# Altium PCB PCB1.PcbDoc
Units mm, origin at the board's own origin, x right, y up, seen from the top; angles counter-clockwise.
Board outline 210 x 7 mm, 2 copper layers (Top Layer, Bottom Layer); 29 components, 28 nets, 59 pads, 0 vias.
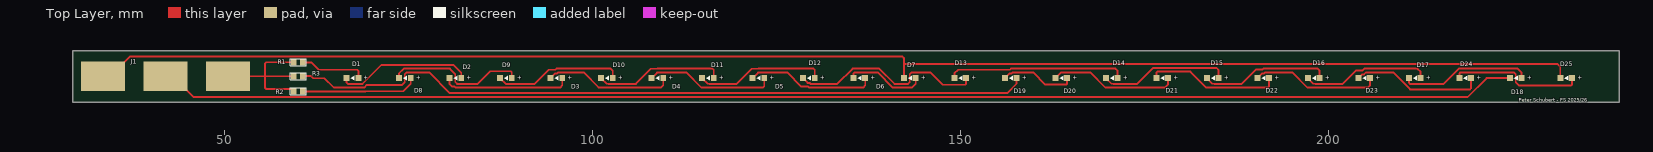
[diagram p0: Top Layer view]
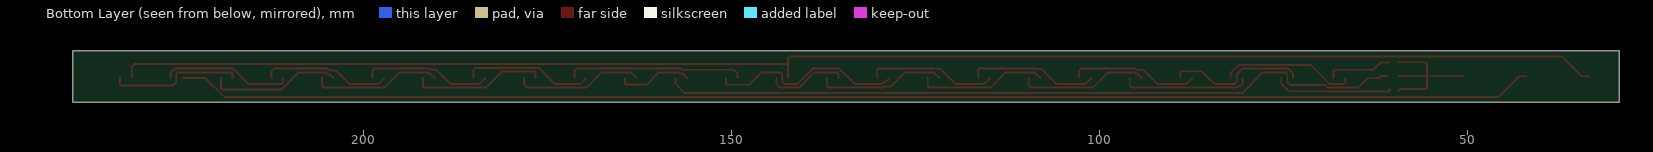
[diagram p1: Bottom Layer view, seen from below]
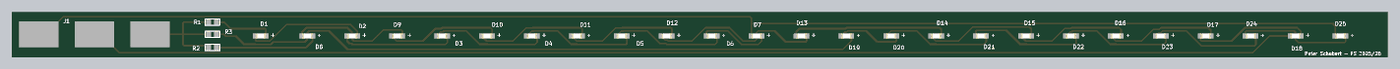
[diagram p2: 3D render of the assembled board from above, using the file's embedded part models]

## Layer stack, top to bottom
Top Solder: solder mask 0.0102, Solder Resist, Dk 3.5
Top Layer: signal copper 0.0356
Dielectric 1: dielectric 0.32, FR-4, Dk 4.8
Bottom Layer: signal copper 0.0356
Bottom Solder: solder mask 0.0102, Solder Resist, Dk 3.5

## Board outline
29.464,67.31 239.464,67.31 239.464,74.31 29.464,74.31

## Design rules (kind name [scope] priority, off if disabled: settings)
AcuteAngle [All] p1: minimum=6.00000000000000E+0001 checktracksonly=FALSE
BoardOutlineClearance "BoardOutlineClearance Overlay" [OnLayer('Top Overlay') or OnLayer('Bottom Overlay')] p1: gap=-2 ignorepadtopadclearanceinfootprint=FALSE
BoardOutlineClearance "BoardOutlineClearance general" [All] p2: gap=0.25 ignorepadtopadclearanceinfootprint=FALSE
Clearance "Clearance TS-LV without coating" [InNetClass('TS') vs InNetClass('LV')] p1 off: gap=20 ignorepadtopadclearanceinfootprint=TRUE except(0: Arc-Text Track-Text SMDPad-Text THPad-Text Via-Text Fill-Text Poly-Text Region-Text Text-Text Text-Hole) // without Conformal Coating (Rules 2023.1.0: EV 4.3.6)
Clearance [All] p2: gap=0.254 ignorepadtopadclearanceinfootprint=FALSE
Clearance "Clearance TS-LV" [InNetClass('TS') vs InNetClass('LV')] p3: gap=4.15 ignorepadtopadclearanceinfootprint=TRUE except(0: Arc-Text Track-Text SMDPad-Text THPad-Text Via-Text Fill-Text Poly-Text Region-Text Text-Text)
Clearance "Clearance TS-TS" [InNetClass('TS+') vs InNetClass('TS-')] p4: gap=3.15 ignorepadtopadclearanceinfootprint=TRUE except(0: Arc-Text Track-Text SMDPad-Text THPad-Text Via-Text Fill-Text Poly-Text Region-Text Text-Text)
Clearance "Clearance general" [All] p5: gap=0.15 ignorepadtopadclearanceinfootprint=TRUE except(0: Arc-Text Track-Text SMDPad-Text THPad-Text Via-Text Text-Text)
ComponentClearance [All] p1: gap=0.1 collisioncheckmode=3 verticalgap=1 showdistances=FALSE donotcheckwithout3dbody=TRUE
Creepage [InNetClass('TS') vs InNetClass('LV')] p1: checkdistance=5 applytopolygonpour=TRUE // Kriechstrecke
DiffPairsRouting [All] p1: maxlimit=0.5 minlimit=0.15 mostfreqgap=0.2 toplayer_minwidth=0.15 toplayer_maxwidth=0.5 toplayer_prefwidth=0.2 bottomlayer_minwidth=0.15 bottomlayer_maxwidth=0.5 bottomlayer_prefwidth=0.2 maxuncoupledlength=12.7
Height [All] p1: minheight=0 maxheight=100 prefheight=15
HoleSize [All] p1: absolutevalues=TRUE maxlimit=5 minlimit=0.25 maxpercent=80.000 minpercent=20.000
HoleToHoleClearance [All] p1: gap=0.5 allowstackedmicrovias=FALSE
MinimumAnnularRing [All] p1: minimumring=0.175
MinimumSolderMaskSliver [All] p1: minsoldermaskwidth=0.15
PasteMaskExpansion "PasteMaskExpansion THT" [OnMultiLayer] p1: expansion=-2539.975 usepaste=FALSE // THT-parts without paste
PasteMaskExpansion [All] p2: expansion=0 percent=10.000000
PlaneClearance [All] p1: clearance=0.5
PlaneConnect [All] p1: planeconnectstyle=Relief reliefexpansion=0.5 reliefentries=4 reliefconductorwidth=0.25 reliefairgap=0.15
PolygonConnect [All] p1: connectstyle=Relief reliefconductorwidth=0.254 reliefentries=4 polygonreliefangle="90 Angle" airgapwidth=0.254
PolygonConnect "PolygonConnect Stitching Via" [IsStitchingVia] p2: connectstyle=Direct reliefconductorwidth=0.254 reliefentries=4 polygonreliefangle="90 Angle" airgapwidth=0.254
PolygonConnect "PolygonConnect general" [All] p3: thpad.connectstyle=Relief thpad.reliefconductorwidth=0.25 thpad.reliefentries=4 thpad.polygonreliefangle="45 Angle" thpad.airgapwidth=0.2 smdpad.connectstyle=Relief smdpad.reliefconductorwidth=0.25 smdpad.reliefentries=4 smdpad.polygonreliefangle="90 Angle" smdpad.airgapwidth=0.2 via.connectstyle=Relief via.reliefconductorwidth=0.25 via.reliefentries=4 via.polygonreliefangle="45 Angle" via.airgapwidth=0.2
RoutingCorners [All] p1: cornerstyle=45-Degree minsetback=2.5 maxsetback=2.5
RoutingTopology "RoutingTopology Top" [OnLayer('Top Layer')] p2: topology=Vertical // Helplines top-layer
RoutingTopology "RoutingTopology Bottom" [OnLayer('Bottom Layer')] p3: topology=Horizontal // Helplines bottom-layer
RoutingVias [All] p1: holewidth=0.711 width=1.27 viastyle="Through Hole" minholewidth=0.711 minwidth=1.27 maxholewidth=0.711 maxwidth=1.27
RoutingVias "RoutingVias StitchingVias" [IsStitchingVia] p2: holewidth=0.3 width=0.65 viastyle="Through Hole" minholewidth=0.25 minwidth=0.6 maxholewidth=0.3 maxwidth=0.65
RoutingVias "RoutingVias general" [All] p3: holewidth=0.3 width=0.65 viastyle="Through Hole" minholewidth=0.25 minwidth=0.6 maxholewidth=0.6 maxwidth=0.85
SMDToCorner [All] p1: distance=39370
SilkToSilkClearance [All] p1: silktosilkclearance=0
SilkToSolderMaskClearance [IsPad] p1: minsilkscreentomaskgap=0.1 clearancetoexposedcopper=FALSE
SolderMaskExpansion [All] p1: expansion=0 istentingtop=FALSE
SolderMaskExpansion "SolderMaskExpansion Vias" [IsVia] p2: expansion=0.1 istentingtop=TRUE // vias tented
SolderMaskExpansion "SolderMaskExpansion general" [All] p3: expansion=0.1 istentingtop=FALSE
SupplyNets "Schematic Supply Nets_2" [InNet('HV+')] p1: voltage=0.000
SupplyNets "Schematic Supply Nets_1" [InNet('LED-')] p2: voltage=0.000
UnRoutedNet [All] p1: checkbadconnections=TRUE
Width [All] p1: maxlimit=0.254 minlimit=0.254 preferedwidth=0.254
Width "Width Powerlane" [InNetClass('Power')] p2: maxlimit=5 minlimit=0.15 preferedwidth=0.5
Width "Width general" [All] p3: maxlimit=3 minlimit=0.15 preferedwidth=0.2
17 further rules are at their usual default settings.

## Components (designator, comment, footprint, x,y, rotation, side; value= is the part's Value field where it differs from the comment)
D1 "Blue, 3.2V" LED_WL-SMCW_0603_H=0.7mm 67.437,70.612 r0 top
D2 "Blue, 3.2V" LED_WL-SMCW_0603_H=0.7mm 81.407,70.612 r0 top
D3 "Blue, 3.2V" LED_WL-SMCW_0603_H=0.7mm 95.123,70.612 r0 top
D4 "Blue, 3.2V" LED_WL-SMCW_0603_H=0.7mm 108.839,70.612 r0 top
D5 "Blue, 3.2V" LED_WL-SMCW_0603_H=0.7mm 122.555,70.612 r0 top
D6 "Blue, 3.2V" LED_WL-SMCW_0603_H=0.7mm 136.271,70.612 r0 top
D7 "Blue, 3.2V" LED_WL-SMCW_0603_H=0.7mm 143.129,70.612 r0 top
D8 "Yellow, 2V" LED_WL-SMCW_0603_H=0.7mm 74.549,70.612 r0 top
D9 "Yellow, 2V" LED_WL-SMCW_0603_H=0.7mm 88.265,70.612 r0 top
D10 "Yellow, 2V" LED_WL-SMCW_0603_H=0.7mm 101.981,70.612 r0 top
D11 "Yellow, 2V" LED_WL-SMCW_0603_H=0.7mm 115.697,70.612 r0 top
D12 "Yellow, 2V" LED_WL-SMCW_0603_H=0.7mm 129.413,70.612 r0 top
D13 "Yellow, 2V" LED_WL-SMCW_0603_H=0.7mm 149.987,70.612 r0 top
D14 "Yellow, 2V" LED_WL-SMCW_0603_H=0.7mm 170.561,70.612 r0 top
D15 "Yellow, 2V" LED_WL-SMCW_0603_H=0.7mm 184.277,70.612 r0 top
D16 "Yellow, 2V" LED_WL-SMCW_0603_H=0.7mm 197.993,70.612 r0 top
D17 "Yellow, 2V" LED_WL-SMCW_0603_H=0.7mm 211.709,70.612 r0 top
D18 "Yellow, 2V" LED_WL-SMCW_0603_H=0.7mm 225.425,70.612 r0 top
D19 "Blue, 3.2V" LED_WL-SMCW_0603_H=0.7mm 156.845,70.612 r0 top
D20 "Blue, 3.2V" LED_WL-SMCW_0603_H=0.7mm 163.703,70.612 r0 top
D21 "Blue, 3.2V" LED_WL-SMCW_0603_H=0.7mm 177.419,70.612 r0 top
D22 "Blue, 3.2V" LED_WL-SMCW_0603_H=0.7mm 191.135,70.612 r0 top
D23 "Blue, 3.2V" LED_WL-SMCW_0603_H=0.7mm 204.851,70.612 r0 top
D24 "Blue, 3.2V" LED_WL-SMCW_0603_H=0.7mm 218.567,70.612 r0 top
D25 "Blue, 3.2V" LED_WL-SMCW_0603_H=0.7mm 232.283,70.612 r0 top
J1 "Pad-Connenctor" "TSAL-L Connector" 42.037,70.866 r90 top
R1 "Resistor" 0603(1608)_L 60.071,72.771 r0 top value=*80R
R2 "Resistor" 0603(1608)_L 60.071,68.834 r0 top value=*100R
R3 "Resistor" 0603(1608)_L 60.071,70.866 r0 top value=*80R

## Footprints (in the part's own frame and the unit in brackets; to place one, negate y for a bottom-side part, rotate by r counter-clockwise, add the part's x,y. Pads: shape width x height; smd on the part's side, far side on the other; paste and mask are expansions set on the pad)
0603(1608)_L [mm] "Chip Resistor, 2-Leads, Body 1.60x0.85mm, IPC High Density"
  rect 0.75x0.85 smd: 1(-0.625,0) 2(0.625,0)
  silkscreen extent -1.1,-0.5 1.1,0.5, body extent -0.85,-0.48 0.85,0.48, height 0.55
LED_WL-SMCW_0603_H=0.7mm [mm] "SMD Mono-color Chip LED, body 1.6x0.8mm"
  rect 0.8x0.8 smd: 1(-0.8,0) 2(0.8,0)
  silkscreen extent -0.23,-0.3 0.25,0.3, body extent -0.8,-0.4 0.8,0.4, height 0.7
"TSAL-L Connector" [mm]
  rect 4x6 smd paste+0 mask+0: 1(0,8.5) 2(0,0) 3(0,-8.5)

## Part data
D1 D2 D3 D4 D5 D6 D7 D19 D20 D21 D22 D23 D24 D25: library part LED-WL-SMCW-150060BS75000, "WL-SMCW SMT Mono-color Chip LED Waterclear, size 0603, Blue, 3.2V, 140deg", Emitting Color=Blue, Forward Voltage typ.=3.2V, Manufacturer="Wurth Elektronik", Operating Temperature="-40 to +85degC", PartNumber=150060BS75000, Chip Technology=InGaN, ComponentLink1Description=Manufacturer, ComponentLink1URL=http://www.we-online.de, ComponentLink2Description=Datasheet, ComponentLink2URL=https://www.we-online.com/catalog/datasheet/150060BS75000.pdf, Dominant Wavelength typ.=470nm, Luminous Intensity typ.=145mcd, Mounting Technology=SMT, Packaging="Tape and Reel", Peak Wavelength typ.=465nm, Published Date="December 2019", Size=0603, Viewing Angle=140deg
D8 D9 D10 D11 D12 D13 D14 D15 D16 D17 D18: library part LED-WL-SMCW-150060YS75000, "WL-SMCW SMT Mono-color Chip LED Waterclear, size 0603, Yellow, 2V, 140deg", Emitting Color=Yellow, Forward Voltage typ.=2V, Manufacturer="Wurth Elektronik", Operating Temperature="-40 to +85degC", Part Number=150060YS75000, Chip Technology=AlInGaP, ComponentLink1Description=Manufacturer, ComponentLink1URL=http://www.we-online.de, ComponentLink2Description=Datasheet, ComponentLink2URL=https://www.we-online.com/catalog/datasheet/150060YS75000.pdf, Dominant Wavelength typ.=590nm, Luminous Intensity typ.=120mcd, Mounting Technology=SMT, Packaging="Tape and Reel", Peak Wavelength typ.=595nm, Published Date="December 2019", Size=0603, Viewing Angle=140deg
J1: library part Pad-Connector
R1 R3: library part RES-Std, "General resistor", Resistance=*80R, Tolerance=*%
R2: library part RES-Std, "General resistor", Resistance=*100R, Tolerance=*%

## Nets (pads, with @x,y where several pads share a name; then routed paths per layer and width w, separated by ;. In a path a pad name is that pad's centre, name@x,y a point inside that pad or via, vN(x,y) a via of type N, cw(c..) or ccw(c..) an arc to the next point about the centre after c; other vN are vias at no path point)
+24V: J1.3 R1.1 R2.1 R3.1 | length 20.3
  Top Layer w0.254: J1.3 55.562,70.866 ; R2.1 59.446,68.884 59.198,69.132 55.711,69.132 55.562,69.281 55.562,70.866 ; R3.1 55.562,70.866 ; R1.1 55.711,72.771 55.562,72.622 55.562,70.866
GND_BLUE: D7.1 D25.1 J1.1 | length 203.6
  Top Layer w0.254: J1.1 34.537,70.866 37.248,73.577 142.1,73.577 142.329,73.348 142.329,72.517 ; D7.1 142.329,72.517 ; D25.1 231.483,72.174 231.14,72.517 142.329,72.517
GND_YELLOW: D18.1 J1.2 | length 184.8
  Top Layer w0.254: J1.2 43.037,70.866 45.875,68.028 218.877,68.028 221.461,70.612 D18.1
NetD1_1: D1.1 D2.2 | length 18.5
  Top Layer w0.254: D1.1 66.637,69.98 66.786,69.831 68.795,69.831 71.373,72.409 81.134,72.409 82.207,71.336 D2.2
NetD1_2: D1.2 R1.2 | length 9
  Top Layer w0.254: R1.2 60.746,72.721 61.899,72.721 62.865,71.755 68.088,71.755 68.237,71.606 D1.2
NetD2_1: D2.1 D3.2 | length 17.4
  Top Layer w0.254: D2.1 80.607,69.858 80.996,69.469 81.293,69.469 81.439,69.323 95.628,69.323 95.923,69.618 D3.2
NetD3_1: D3.1 D4.2 | length 17.6
  Top Layer w0.254: D3.1 94.958,71.247 95.219,71.247 95.365,71.393 98.814,71.393 100.865,69.342 101.994,69.342 102.013,69.323 109.328,69.323 109.639,69.634 D4.2
NetD4_1: D4.1 D5.2 | length 17.7
  Top Layer w0.254: D4.1 108.801,71.374 109.062,71.374 109.081,71.393 112.765,71.393 114.816,69.342 115.71,69.342 115.729,69.323 123.187,69.323 123.355,69.491 D5.2
NetD5_1: D5.1 D6.2 | length 17.6
  Top Layer w0.254: D5.1 122.517,71.374 122.778,71.374 122.797,71.393 126.481,71.393 128.405,69.469 129.299,69.469 129.445,69.323 136.776,69.323 137.071,69.618 D6.2
NetD6_1: D6.1 D7.2 | length 11
  Top Layer w0.254: D6.1 135.471,71.244 135.62,71.393 138.77,71.393 140.84,69.323 143.394,69.323 143.929,69.858 D7.2
NetD8_1: D8.1 D9.2 | length 19.3
  Top Layer w0.254: D8.1 73.749,71.246 74.404,71.901 80.657,71.901 81.388,71.17 81.388,70.092 81.649,69.831 84.427,69.831 86.138,71.542 88.916,71.542 89.065,71.393 D9.2
NetD8_2: D8.2 R2.2 | length 16.2
  Top Layer w0.254: R2.2@60.579,69.088 R2.2@60.833,68.834 ; R2.2@60.696,68.815 69.216,68.815 69.235,68.834 74.352,68.834 75.349,69.831 D8.2
NetD9_1: D9.1 D10.2 | length 17.6
  Top Layer w0.254: D9.1 88.246,69.831 92.191,69.831 94.115,71.755 95.009,71.755 95.155,71.901 102.486,71.901 102.781,71.606 D10.2
NetD10_1: D10.1 D11.2 | length 17.7
  Top Layer w0.254: D10.1 101.943,69.85 102.204,69.85 102.223,69.831 105.919,69.831 107.97,71.882 108.852,71.882 108.871,71.901 116.329,71.901 116.497,71.733 D11.2
NetD11_1: D11.1 D12.2 | length 17.7
  Top Layer w0.254: D11.1 115.659,69.85 115.92,69.85 115.939,69.831 119.623,69.831 121.674,71.882 122.568,71.882 122.587,71.901 130.045,71.901 130.213,71.733 D12.2
NetD12_1: D12.1 D13.2 | length 27
  Top Layer w0.254: D12.1 129.248,69.977 129.509,69.977 129.655,69.831 133.283,69.831 135.353,71.901 138.981,71.901 141.051,69.831 142.887,69.831 143.129,70.073 143.129,71.151 143.371,71.393 145.908,71.393 147.578,69.723 150.638,69.723 150.787,69.872 D13.2
NetD13_1: D13.1 D14.2 | length 24.2
  Top Layer w0.254: D13.1 149.187,71.247 149.695,71.755 156.731,71.755 156.877,71.901 171.05,71.901 171.361,71.59 D14.2
NetD14_1: D14.1 D15.2 | length 17.8
  Top Layer w0.254: D14.1 170.523,69.85 170.784,69.85 170.803,69.831 173.998,69.831 176.176,72.009 184.785,72.009 185.077,71.717 D15.2
NetD15_1: D15.1 D16.2 | length 17.6
  Top Layer w0.254: D15.1 184.24,69.849 184.501,69.849 184.519,69.831 188.203,69.831 190.137,71.764 191.03,71.764 191.167,71.901 198.508,71.901 198.793,71.616 D16.2
NetD16_1: D16.1 D17.2 | length 17.5
  Top Layer w0.254: D16.1 197.955,69.85 198.216,69.85 198.235,69.831 201.93,69.831 203.727,71.628 204.61,71.628 204.883,71.901 212.071,71.901 212.509,71.463 D17.2
NetD17_1: D17.1 D18.2 | length 17.8
  Top Layer w0.254: D17.1@210.919,70.612 210.919,69.98 211.068,69.831 215.635,69.831 217.705,71.901 225.69,71.901 226.225,71.366 D18.2
NetD19_1: D19.1 D20.2 | length 10.3
  Top Layer w0.254: D19.1 156.68,71.247 156.941,71.247 157.087,71.393 159.891,71.393 161.55,69.734 164.354,69.734 164.503,69.883 D20.2
NetD19_2: D19.2 R3.2 | length 101.3
  Top Layer w0.254: R3.2@60.961,70.944 61.005,70.899 61.816,70.899 62.114,70.601 63.628,70.601 64.887,69.342 66.556,69.342 66.575,69.323 69.005,69.323 69.371,69.689 74.164,69.689 74.53,70.054 74.53,71.132 74.791,71.393 77.848,71.393 80.661,68.58 156.337,68.58 157.645,69.888 D19.2
NetD20_1: D20.1 D21.2 | length 17.5
  Top Layer w0.254: D20.1 163.684,71.393 167.629,71.393 169.68,69.342 170.574,69.342 170.593,69.323 177.781,69.323 178.219,69.761 D21.2
NetD21_1: D21.1 D22.2 | length 18.2
  Top Layer w0.254: D21.1 176.619,71.352 176.768,71.501 181.237,71.501 183.398,69.341 184.291,69.341 184.309,69.323 191.768,69.323 191.935,69.49 D22.2
NetD22_1: D22.1 D23.2 | length 17.6
  Top Layer w0.254: D22.1 190.979,71.256 191.241,71.256 191.377,71.393 195.061,71.393 197.112,69.342 198.006,69.342 198.025,69.323 205.34,69.323 205.651,69.634 D23.2
NetD23_1: D23.1 D24.2 | length 18
  Top Layer w0.254: D23.1@204.061,70.622 204.559,71.12 204.82,71.12 205.093,71.393 208.788,71.393 211.093,69.088 219.218,69.088 219.367,69.237 D24.2
NetD24_1: D24.1 D25.2 | length 18.3
  Top Layer w0.254: D24.1 217.767,71.244 217.916,71.393 225.183,71.393 225.425,71.151 225.425,70.073 225.902,69.596 232.934,69.596 233.083,69.745 D25.2

## Silkscreen, mask and mechanical layers (free items; w line width, h text height)
Top Overlay:
  text "Peter Schubert - FS 2025/26" at 225.807,67.437 h0.5

## Text inside footprints (layer, text, board x,y; h text height)
D1: Top Overlay "+" at 69.537,70.312 h0.6 r90
D2: Top Overlay "+" at 83.507,70.312 h0.6 r90
D3: Top Overlay "+" at 97.223,70.312 h0.6 r90
D4: Top Overlay "+" at 110.939,70.312 h0.6 r90
D5: Top Overlay "+" at 124.655,70.312 h0.6 r90
D6: Top Overlay "+" at 138.371,70.312 h0.6 r90
D7: Top Overlay "+" at 145.229,70.312 h0.6 r90
D8: Top Overlay "+" at 76.649,70.312 h0.6 r90
D9: Top Overlay "+" at 90.365,70.312 h0.6 r90
D10: Top Overlay "+" at 104.081,70.312 h0.6 r90
D11: Top Overlay "+" at 117.797,70.312 h0.6 r90
D12: Top Overlay "+" at 131.513,70.312 h0.6 r90
D13: Top Overlay "+" at 152.087,70.312 h0.6 r90
D14: Top Overlay "+" at 172.661,70.312 h0.6 r90
D15: Top Overlay "+" at 186.377,70.312 h0.6 r90
D16: Top Overlay "+" at 200.093,70.312 h0.6 r90
D17: Top Overlay "+" at 213.809,70.312 h0.6 r90
D18: Top Overlay "+" at 227.525,70.312 h0.6 r90
D19: Top Overlay "+" at 158.945,70.312 h0.6 r90
D20: Top Overlay "+" at 165.803,70.312 h0.6 r90
D21: Top Overlay "+" at 179.519,70.312 h0.6 r90
D22: Top Overlay "+" at 193.235,70.312 h0.6 r90
D23: Top Overlay "+" at 206.951,70.312 h0.6 r90
D24: Top Overlay "+" at 220.667,70.312 h0.6 r90
D25: Top Overlay "+" at 234.383,70.312 h0.6 r90